# Altium PCB DB30.PcbDoc (part 6 of 8)
Units mil, origin at the board's own origin, x right, y up, seen from the top; angles counter-clockwise.
Board outline 3236.22 x 4456.69 mil, 8 copper layers (Top Layer, MidLayer1, MidLayer2, GND-Layer5, MidLayer3, VCC, MidLayer4, Bottom Layer), stack 61.8 mil thick; 219 components, 472 nets, 1811 pads, 1561 vias.
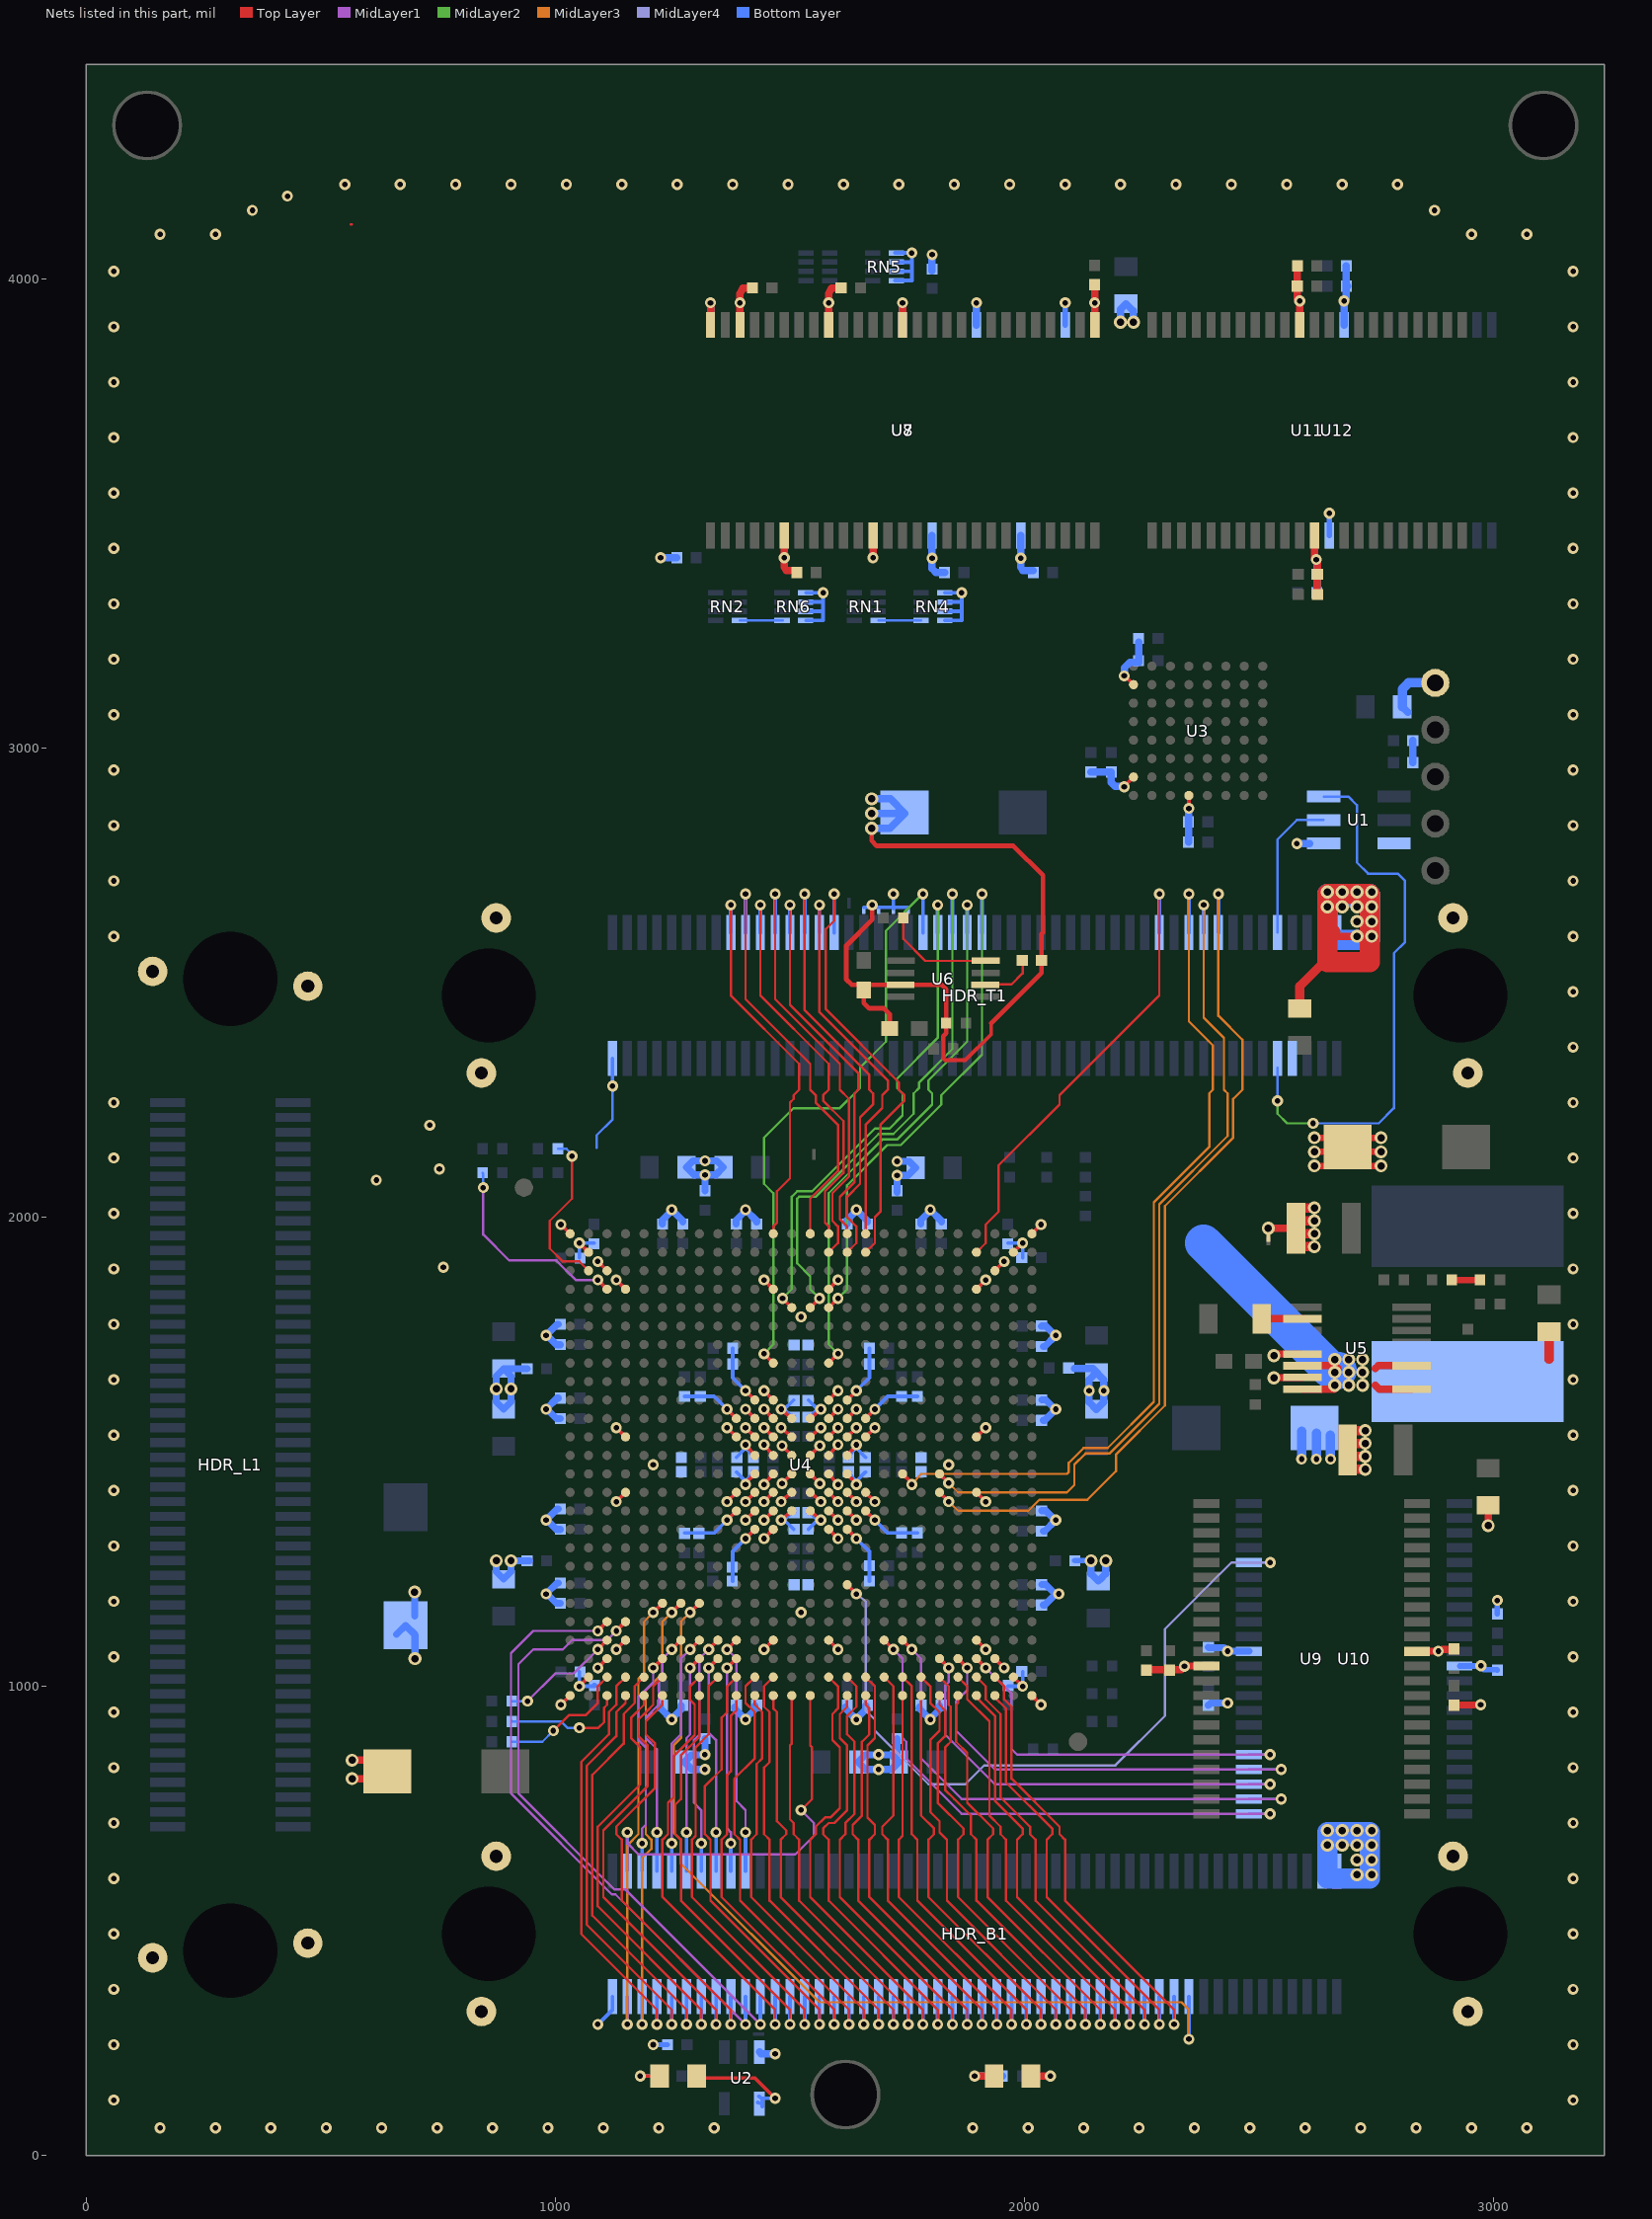
[diagram p12: the nets of this part, all layers, seen from the top]

## Via types
v1: diameter 23.62, hole 11.81, Top Layer to Bottom Layer, 944 vias
v2: diameter 23.62, hole 11.81, Top Layer to Bottom Layer, tented both sides, 477 vias
v3: diameter 27.56, hole 15.75, Top Layer to Bottom Layer, 139 vias
v4: diameter 23.62, hole 11.81, Top Layer to Bottom Layer, tented top, 1 vias

## Nets (pads, with @x,y where several pads share a name; then routed paths per layer and width w, separated by ;. In a path a pad name is that pad's centre, name@x,y a point inside that pad or via, vN(x,y) a via of type N, cw(c..) or ccw(c..) an arc to the next point about the centre after c; other vN are vias at no path point) (continued)
GND: C1.1 C2.2 C3.2 C4.2 C5.2 C6.2 C7.2 C8.2 C9.2 C10.2 C11.2 C12.2 C13.2 C14.2 C15.2 C16.2 C17.2 C18.2 C19.2 C20.2 C21.2 C22.2 C23.2 C24.2 C25.2 C26.2 C27.2 C28.2 C29.2 C30.2 C31.2 C32.2 C33.2 C34.2 C35.2 C36.2 C37.2 C38.2 C39.2 C40.2 C41.2 C42.2 C43.2 C44.2 C45.2 C46.2 C47.2 C48.2 C49.2 C50.2 C51.2 C52.2 C53.2 C54.2 C55.2 C56.2 C57.2 C58.2 C59.2 C60.2 C61.2 C62.2 C63.2 C64.2 C65.2 C66.2 C67.2 C68.2 C69.2 C70.2 C71.2 C72.2 C73.2 C74.2 C75.2 C76.2 C77.2 C78.2 C79.2 C80.2 C81.2 C82.2 C83.2 C84.2 C85.2 C86.2 C87.2 C88.2 C89.2 C90.2 C91.2 C92.2 C93.2 C94.2 C95.2 C96.2 C97.2 C98.2 C99.2 C100.2 C101.2 C102.2 C103.2 C104.2 C105.2 C106.2 C107.2 C108.1 C109.2 C110.2 C111.2 C112.2 C113.2 C114.2 C115.2 C116.2 C119.2 C120.2 C121.2 C122.2 C123.2 C125.2 C126.2 C127.2 C128.2 C129.2 C130.2 C131.2 C132.2 C133.2 C134.2 C135.2 C136.2 C137.2 C138.2 C139.2 C140.2 C141.2 C142.2 C143.2 C144.2 C145.2 C146.2 C147.2 C148.2 C149.2 C150.2 C151.2 HDR_B1.1 HDR_B1.98 HDR_B1.100 HDR_B1.MH1 HDR_B1.MH2 HDR_B1.MH3 HDR_B1.MH4 HDR_L1.MH1 HDR_L1.MH2 HDR_L1.MH3 HDR_L1.MH4 HDR_T1.1 HDR_T1.98 HDR_T1.100 HDR_T1.MH1 HDR_T1.MH2 HDR_T1.MH3 HDR_T1.MH4 LED2.2 NT4.2 NT5.2 NT6.2 NT7.2 NT8.2 R25.2 RN4.1 RN4.2 RN4.3 RN4.4 RN5.1 RN5.2 RN5.3 RN5.4 RN6.1 RN6.2 RN6.3 RN6.4 TP1.1 U1.1 U2.3 U3.E8 U3.H2 U3.H7 U4.A1 U4.A26 U4.AC4 U4.AC12 U4.AC15 U4.AC23 U4.AD3 U4.AD24 U4.AE2 U4.AE25 U4.AF1 U4.AF26 U4.B2 U4.B25 U4.C3 U4.C24 U4.D4 U4.D12 U4.D15 U4.D23 U4.K11 U4.K12 U4.K15 U4.K16 U4.L10 U4.L11 U4.L12 U4.L13 U4.L14 U4.L15 U4.L16 U4.L17 U4.M4 U4.M10 U4.M11 U4.M12 U4.M13 U4.M14 U4.M15 U4.M16 U4.M17 U4.M23 U4.N11 U4.N12 U4.N13 U4.N14 U4.N15 U4.N16 U4.P11 U4.P12 U4.P13 U4.P14 U4.P15 U4.P16 U4.R4 U4.R10 U4.R11 U4.R12 U4.R13 U4.R14 U4.R15 U4.R16 U4.R17 U4.R23 U4.T10 U4.T11 U4.T12 U4.T13 U4.T14 U4.T15 U4.T16 U4.T17 U4.U11 U4.U12 U4.U15 U4.U16 U5.13 U5.15 U6.3 U7.6 U7.12 U7.28 U7.41 U7.46 U7.52 U7.54 U8.6 U8.12 U8.28 U8.41 U8.46 U8.52 U8.54 U9.12 U9.34 U10.12 U10.34 U11.12 U11.34 U12.12 U12.34 | length 15039.3
  Top Layer w5: 564,4116 566,4116
  Top Layer w7.87: v1(1011.81,960.63) U4.AF1@1031.5,980.31 ; v1(1011.81,1984.25) U4.A1@1031.5,1964.57 ; v1(1051.18,1000) U4.AE2@1070.87,1019.68 ; v1(1051.18,1944.88) U4.B2@1070.87,1925.2 ; v1(1090.55,1039.37) U4.AD3@1110.24,1059.05 ; v1(1090.55,1905.51) U4.C3@1110.24,1885.83 ; v1(1129.92,1078.74) U4.AC4@1149.61,1098.43 ; v1(1129.92,1393.7) U4.R4@1149.61,1413.39 ; v1(1129.92,1551.18) U4.M4@1149.61,1531.5 ; v1(1129.92,1866.14) U4.D4@1149.61,1846.46 ; v1(1366.14,1354.33) U4.T10@1385.83,1374.02 ; v1(1366.14,1393.7) U4.R10@1385.83,1413.39 ; v1(1366.14,1551.18) U4.M10@1385.83,1531.5 ; v1(1366.14,1590.55) U4.L10@1385.83,1570.87 ; v1(1405.51,1314.96) U4.U11@1425.2,1334.65 ; v1(1405.51,1354.33) U4.T11@1425.2,1374.02 ; v1(1405.51,1393.7) U4.R11@1425.2,1413.39 ; v1@1405.51,1433.07 U4.P11@1425.2,1452.76 ; v1(1405.51,1514.76) U4.N11@1425.2,1492.13 ; v1(1405.51,1551.18) U4.M11@1425.2,1531.5 ; v1(1405.51,1590.55) U4.L11@1425.2,1570.87 ; v1(1405.51,1629.92) U4.K11@1425.2,1610.24 ; v1(1444.88,1078.74) U4.AC12@1464.57,1098.43 ; v1(1444.88,1314.96) U4.U12@1464.57,1334.65 ; v1(1444.88,1354.33) U4.T12@1464.57,1374.02 ; v1(1444.88,1393.7) U4.R12@1464.57,1413.39 ; v1(1444.88,1430.12) U4.P12@1464.57,1452.76 ; v1(1444.88,1514.76) U4.N12@1464.57,1492.13 ; v1(1444.88,1551.18) U4.M12@1464.57,1531.5 ; v1(1444.88,1590.55) U4.L12@1464.57,1570.87 ; v1(1444.88,1629.92) U4.K12@1464.57,1610.24 ; v1(1444.88,1866.14) U4.D12@1464.57,1846.46 ; v1(1481.3,1354.33) U4.T13@1503.94,1374.02 ; v1(1481.3,1393.7) U4.R13@1503.94,1413.39 ; v1(1481.3,1551.18) U4.M13@1503.94,1531.5 ; v1(1481.3,1590.55) U4.L13@1503.94,1570.87 ; v1(1483.27,1432.09) U4.P13@1503.94,1452.76 ; v1(1483.27,1512.8) U4.N13@1503.94,1492.13 ; U4.T14@1543.31,1374.02 v1(1565.94,1354.33) ; U4.R14@1543.31,1413.39 v1(1565.94,1393.7) ; U4.P14@1543.31,1452.76 v1(1563.98,1432.09) ; U4.N14@1543.31,1492.13 v1(1563.98,1512.8) ; U4.M14@1543.31,1531.5 v1(1565.94,1551.18) ; U4.L14@1543.31,1570.87 v1(1565.94,1590.55) ; U4.AC15@1582.68,1098.43 v1(1602.36,1078.74) ; U4.U15@1582.68,1334.65 v1(1602.36,1314.96) ; U4.T15@1582.68,1374.02 v1(1602.36,1354.33) ; U4.R15@1582.68,1413.39 v1(1602.36,1393.7) ; U4.P15@1582.68,1452.76 v1(1602.36,1430.12) ; U4.N15@1582.68,1492.13 v1(1602.36,1514.76) ; U4.M15@1582.68,1531.5 v1(1602.36,1551.18) ; U4.L15@1582.68,1570.87 v1(1602.36,1590.55) ; U4.K15@1582.68,1610.24 v1(1602.36,1629.92) ; U4.D15@1582.68,1846.46 v1(1602.36,1866.14) ; U4.U16@1622.05,1334.65 v1(1641.73,1314.96) ; U4.T16@1622.05,1374.02 v1(1641.73,1354.33) ; U4.R16@1622.05,1413.39 v1(1641.73,1393.7) ; U4.P16@1622.05,1452.76 v1(1641.73,1430.12) ; U4.N16@1622.05,1492.13 v1(1641.73,1514.76) ; U4.M16@1622.05,1531.5 v1(1641.73,1551.18) ; U4.L16@1622.05,1570.87 v1(1641.73,1590.55) ; U4.K16@1622.05,1610.24 v1(1641.73,1629.92) ; U4.T17@1661.42,1374.02 v1(1681.1,1354.33) ; U4.R17@1661.42,1413.39 v1(1681.1,1393.7) ; U4.M17@1661.42,1531.5 v1(1681.1,1551.18) ; U4.L17@1661.42,1570.87 v1(1681.1,1590.55) ; U4.AC23@1897.64,1098.43 v1(1917.32,1078.74) ; U4.R23@1897.64,1413.39 v1(1917.32,1393.7) ; U4.M23@1897.64,1531.5 v1(1917.32,1551.18) ; U4.D23@1897.64,1846.46 v1(1917.32,1866.14) ; U4.AD24@1937.01,1059.05 v1(1956.69,1039.37) ; U4.C24@1937.01,1885.83 v1(1956.69,1905.51) ; U4.AE25@1976.38,1019.68 v1(1996.06,1000) ; U4.B25@1976.38,1925.2 v1(1996.06,1944.88) ; U4.AF26@2015.75,980.31 v1(2035.43,960.63) ; U4.A26@2015.75,1964.57 v1(2035.43,1984.25) ; v1@2212.6,2918.31 U3.H7@2232.28,2937.99 ; v1@2212.6,3154.53 U3.H2@2232.28,3134.84 ; v1(2350.4,2871.07) U3.E8@2350.39,2898.62
  Top Layer w8: 1826.77,2377.95 1827.63,2377.09 1827.63,2337.72 1830.71,2334.65 1874.02,2334.65 1929.13,2389.76 1929.13,2413.38
  Top Layer w10: C126.2@1657.48,2484.25 1657.48,2456.7 1669.29,2444.88 1700.79,2444.88 1712.59,2433.07 C125.2@1712.59,2409.44 ; C126.2@1664.36,2495.07 1823.82,2495.07 1833.15,2485.75 1833.15,2392.2 1826.77,2385.83 1826.77,2377.95 ; v3(1674.21,2828.74) 1674.21,2802.16 1685.04,2791.33 1976.37,2791.33 2039.37,2728.34 2039.37,2606.29 2036.41,2603.34 2036.41,2520.67 1929.13,2413.38 ; v2(1675.2,2665.35) 1675.2,2633.86 1620.08,2578.74 1620.08,2506.89 1631.89,2495.07 1678.15,2495.07
  Top Layer w13.78: v3(2618.11,2109.29) C119.2@2669.08,2109.29 ; v3(2618.11,2139.29) C119.2@2669.08,2139.29 ; v3(2618.11,2169.29) C119.2@2669.08,2169.29 ; C119.2@2709.01,2109.29 v3(2759.99,2109.29) ; C119.2@2709.01,2139.29 v3(2759.99,2139.29) ; C119.2@2709.01,2169.29 v3(2759.99,2169.29)
  Top Layer w15: C139.2@2259.84,1034.45 2260.82,1035.43 2334.65,1035.43 2341,1041.79 v1(2341,1043) 2341.3,1043.3 U9.34@2387.89,1043.3 ; v3(2531.5,1657.48) 2532.26,1658.25 U5.15@2591.08,1658.25 ; v3(2531.5,1704.72) 2535.43,1708.66 U5.13@2590.55,1708.66 ; U9.12@2836.71,1074.8 2881.8,1074.8 v1(2882,1075) 2886.02,1075 2889.76,1078.74 2914.47,1078.74 C136.2@2915.44,1079.71 ; C138.2@2915.3,957.92 2917.32,957.76 2914.45,960.63 v1(2972.44,960.63)
  Top Layer w15.75: v3(566.93,803.15) 626.34,803.15 C23.2@641.81,818.62 617.91,842.52 v3(566.93,842.52) ; U7.54@1330.71,3901.57 v2(1330.71,3948.82) ; U7.52@1393.7,3901.57 v2(1393.7,3948.82) ; v2@1393.7,3944.88 1393.7,3964.57 ; 1393.7,3968.51 1399.61,3980.32 C132.2@1420.27,3980.31 ; C132.2@1416.34,3980.32 C132.2@1418.31,3978.34 ; U7.6@1488.19,3452.76 1488.19,3409.45 v2(1488.19,3405.51) 1488.19,3385.83 1492.13,3377.95 C129.2@1514.77,3377.95 ; U7.46@1582.68,3901.57 v2(1582.68,3948.82) ; v2@1582.68,3944.88 1582.68,3964.57 1582.68,3968.51 1588.58,3980.32 C133.2@1609.25,3980.31 ; v2(1677.17,3405.51) U7.12@1677.17,3452.76 ; U7.41@1740.16,3901.57 v2(1740.16,3948.82) ; LED2.2@2011.81,169.29 v1(2055.12,169.29) ; U7.28@2149.61,3901.57 C128.2@2149.6,3987.2 ; v3(2519.68,1976.38) C123.2@2582.67,1976.38 ; C145.2@2580.43,4028.54 C145.2@2580.57,4028.67 ; C145.2@2581.69,4027.55 2581.69,3957.68 v2(2586.61,3952.76) U11.34@2586.61,3901.57 ; U11.12@2618.11,3452.76 2618.11,3405.51 2624.72,3398.9 C148.2@2624.72,3370.07 C148.2@2625.71,3371.06 ; C144.2@2623.74,3329.72 2623.74,3370.07 C148.2@2623.77,3370.23 ; 2645.67,2598.43 v3(2708.66,2598.43) ; v3(2988.19,1342.52) C120.2@2988.18,1385.82
  Top Layer w19.68: C24.2@2586.61,2444.88 2586.61,2492.12 2649.61,2555.12 ; 3118.09,1696.83 C122.2@3118.1,1755.9
  Top Layer w20: C123.2@2578.73,1937 v3(2618.1,1937) ; C123.2@2578.73,1964.56 v3(2618.1,1964.56) ; C123.2@2578.73,1992.12 v3(2618.1,1992.12) ; C123.2@2578.73,2019.68 v3(2618.1,2019.68) ; C121.2@2687.01,1462.59 v3(2726.38,1462.59) ; C121.2@2687.01,1490.15 v3(2726.38,1490.15) ; C121.2@2687.01,1517.71 v3(2726.38,1517.71) ; C121.2@2687.01,1545.27 v3(2726.38,1545.27)
  Top Layer w39.37: 2645.67,2606.3 2653.54,2606.3
  Top Layer w43.31: 2645.67,2543.31 2736.22,2543.31 2736.22,2688.98 2645.67,2688.98 2645.67,2543.31
  Bottom Layer w5: 1087.87,2147.57 1087.87,2174.07 1122.05,2208.25 v2(1122.05,2279.53)
  Bottom Layer w7.87: C35.2@1051.18,1031.5 v1(1051.18,1000) C38.2@1082.68,1000 ; C41.2@1051.18,1913.39 v1(1051.18,1944.88) C33.2@1082.68,1944.88 ; v1@1082.68,1039.37 v1(1090.55,1039.37) v1@1090.55,1031.5 ; v1@1082.68,1905.51 v1(1090.55,1905.51) v1@1090.55,1913.38 ; v2(1090.55,279.53) 1122.05,311.02 HDR_B1.1@1122.05,338.58 ; v2(1122.05,2279.53) HDR_T1.1@1122.05,2338.58 ; v1(1248.03,2015.75) v1@1251.97,2015.75 ; C19.2@1275.59,1326.77 1311.02,1326.77 1338.58,1326.77 v1(1366.14,1354.33) ; C13.2@1275.59,1618.11 1276.38,1618.11 1306.51,1618.11 1338.58,1618.11 v1(1366.14,1590.55) ; C20.2@1377.95,1224.41 1377.95,1228.34 1377.95,1253.94 1377.95,1287.4 v1(1405.51,1314.96) ; C18.2@1377.95,1720.47 C14.2@1377.95,1687.01 1377.95,1657.48 v1(1405.51,1629.92) ; C66.2@1385.83,1456.69 1405.51,1437.01 C95.2@1425.2,1456.69 ; C93.2@1385.83,1488.19 v1@1405.51,1507.87 ; v1(1405.51,1514.76) v1@1405.51,1507.88 ; C94.2@1425.2,1488.19 v1@1405.51,1507.88 ; v1(1481.3,1354.33) v1@1488.19,1354.33 ; C88.2@1507.87,1334.65 v1@1488.19,1354.33 ; C82.2@1507.87,1374.02 v1@1488.19,1354.33 ; C73.2@1507.87,1570.87 1488.19,1590.55 C67.2@1507.87,1610.24 ; RN6.4@1534.64,3271.65 1570.87,3271.65 v1(1570.87,3330.71) RN6.1@1534.64,3330.71 ; RN6.3@1534.64,3291.34 1570.87,3291.34 ; RN6.2@1534.64,3311.02 1570.87,3311.02 ; C92.2@1539.37,1334.65 v1@1559.06,1354.33 ; C98.2@1539.37,1374.02 v1@1559.06,1354.33 ; C74.2@1539.37,1570.87 v1@1559.06,1590.55 ; C75.2@1539.37,1610.24 v1@1559.05,1590.55 ; v1(1565.94,1354.33) v1@1559.06,1354.33 ; v1(1565.94,1590.55) v1@1559.06,1590.55 ; C90.2@1622.05,1456.69 v1@1641.73,1437.01 ; C78.2@1622.05,1488.19 v1@1641.73,1507.87 ; v1(1641.73,1314.96) 1669.29,1287.4 C7.2@1669.29,1256.89 C15.2@1669.29,1224.41 ; v1(1641.73,1430.12) v1@1641.73,1437.01 ; v1(1641.73,1514.76) v1@1641.73,1507.87 ; v1(1641.73,1629.92) 1669.29,1657.48 1669.29,1688.98 C21.2@1669.29,1720.47 ; NT7.2@1657.48,2660.43 NT4.2@1751.97,2660.43 ; C77.2@1661.42,1456.69 v1@1641.73,1437.01 ; C72.2@1661.42,1488.19 v1@1641.73,1507.87 ; v1(1681.1,1354.33) 1708.66,1326.77 1744.09,1326.77 1771.06,1326.77 C8.2@1771.65,1326.77 ; v1(1681.1,1590.55) 1708.66,1618.11 C17.2@1738.19,1618.11 C10.2@1771.65,1618.11 ; NT5.2@1720.47,2657.48 v2(1720.47,2688.98) ; RN5.4@1723.62,3996.06 1759.84,3996.06 v1(1759.84,4055.12) RN5.1@1723.62,4055.12 ; RN5.3@1723.62,4015.75 1759.84,4015.75 ; RN5.2@1723.62,4035.43 1759.84,4035.43 ; C51.2@1771.65,952.76 C51.2@1772.14,952.26 ; RN4.4@1829.92,3271.65 1866.14,3271.65 v1(1866.14,3330.71) RN4.1@1829.92,3330.71 ; RN4.3@1829.92,3291.34 1866.14,3291.34 ; RN4.2@1829.92,3311.02 1866.14,3311.02 ; C31.2@1964.57,1000 v1(1996.06,1000) C36.2@1996.06,1031.5 ; C34.2@1964.57,1944.88 v1(1996.06,1944.88) C37.2@1996.06,1913.39
  Bottom Layer w9.84: v1(1208.66,236.22) C108.1@1239.17,236.22
  Bottom Layer w11.81: C38.2@1083.25,1001.71 C38.2@1083.47,1001.49 ; U8.52@2086.61,3901.57 v2(2086.61,3948.82) ; C39.2@2107.28,1267.71 v3(2141.73,1267.72) ; U8.54@2149.61,3901.57 v2(2149.61,3948.82) ; U12.12@2649.61,3452.76 v2(2649.61,3500) ; U10.34@2927.25,1043.3 v1@2972.3,1043.3 ; v1(2973,1044) v1@2972.3,1043.3 ; C143.2@3007.87,1034.45 3006.88,1035.43 2979.33,1035.43 2972.3,1042.47 v1@2972.3,1043.3 ; C141.2@3007.87,1154.53 v1(3007.87,1183.07)
  Bottom Layer w15: C106.2@661.42,1110.59 C106.2@680.83,1130 700.79,1110.04 v3(700.79,1059.06) ; C106.2@700.23,1149.41 v3(700.23,1200.94) ; v3(874.02,1267.72) 874.02,1244.09 C45.2@889.76,1228.34 905.51,1244.09 v3(905.51,1267.72) C28.2@944.88,1267.72 ; C32.2@939.96,1677.16 C43.2@889.76,1677.16 ; v1(980.31,1196.85) 1003.94,1220.48 C56.2@1006.89,1220.48 ; v1(980.31,1354.33) 1003.94,1377.96 C101.2@1006.89,1377.96 ; v1(980.31,1590.55) 1003.94,1614.18 C102.2@1006.89,1614.18 ; v1(980.31,1748.03) 1003.94,1771.66 C104.2@1006.89,1771.66 ; v1@984.31,1194.81 1002.24,1176.88 C84.2@1010.54,1176.88 ; v1@984.31,1352.29 1002.24,1334.36 C53.2@1010.54,1334.36 ; v1@984.31,1588.51 1002.24,1570.58 C58.2@1010.54,1570.58 ; v1@984.31,1745.99 1002.24,1728.07 C61.2@1010.54,1728.07 ; C62.2@1224.4,955.71 1224.4,952.76 v1(1248.03,929.13) ; C59.2@1228.06,1985.52 1228.06,1993.82 v1@1245.99,2011.75 ; v1(1248.03,2015.75) 1271.66,1992.12 C70.2@1271.66,1989.17 ; v1@1250.07,933.13 1268,951.06 C85.2@1268,959.36 ; v2(1318.9,822.83) 1291.33,822.83 C49.2@1275.59,838.58 1291.34,854.33 v2(1318.9,854.33) C40.2@1318.89,888.78 ; C29.2@1318.89,2056.1 1318.89,2089.89 v1(1319.02,2090) ; C83.2@1381.88,955.71 1381.88,952.76 v1(1405.51,929.13) ; C100.2@1385.54,1985.52 1385.54,1993.82 v1@1403.47,2011.75 ; v1(1405.51,2015.75) 1429.14,1992.12 C65.2@1429.14,1989.17 ; v1@1407.55,933.13 1425.48,951.06 C57.2@1425.48,959.36 ; C52.2@1618.11,955.71 1618.11,952.76 v1(1641.73,929.13) ; C99.2@1621.77,1985.52 1621.77,1993.82 v1@1639.69,2011.75 ; v1(1641.73,2015.75) 1665.36,1992.12 C64.2@1665.36,1989.17 ; v1@1643.77,933.13 1661.7,951.06 C91.2@1661.7,959.36 ; C48.2@1728.34,850.4 C30.2@1728.34,888.78 ; C26.2@1728.34,2052.41 v1@1728.34,2092.69 ; v1@1728.34,2085.06 v1(1728.58,2089.02) 1751.54,2089 C44.2@1767.84,2105.29 1754.13,2119 v1(1728.58,2119.02) ; C51.2@1775.59,955.71 1775.59,952.76 v1(1799.21,929.13) ; C68.2@1779.25,1985.52 1779.25,1993.82 v1@1797.18,2011.75 ; v1(1799.21,2015.75) 1822.84,1992.12 C60.2@1822.84,1989.17 ; v1@1801.25,933.13 1819.18,951.06 C69.2@1819.18,959.36 ; C89.2@2036.41,1767.71 2036.7,1768 2045,1768 2062.93,1750.07 2066.93,1750.07 v1(2066.93,1748.03) 2043.3,1724.41 C54.2@2040.35,1724.41 ; C103.2@2036.7,1216.82 2045,1216.82 v1@2062.93,1198.89 ; C55.2@2036.7,1374.3 2045,1374.3 v1@2062.93,1356.37 ; C71.2@2036.7,1610.52 2045,1610.52 v1@2062.93,1592.59 ; C50.2@2040.35,1173.22 2043.3,1173.22 v1@2066.93,1196.85 ; C63.2@2040.35,1566.93 2043.3,1566.93 v1(2066.93,1590.55) ; C105.2@2040.64,1331 2040.35,1330.71 2043.3,1330.7 v1(2066.93,1354.33) ; v1@2069.99,1194.01 v1(2072.99,1197.01) ; C140.2@2391.82,959.64 2396.75,964.57 v1(2433.07,964.57) ; C142.2@2391.82,1083.65 2392.8,1082.68 2425.2,1082.68 2432.87,1075 v1(2433,1075) 2433.21,1074.79 U10.12@2478.44,1074.79 ; C43.2@889.76,1677.16 874.02,1661.42 874.02,1606.29 C4.2@889.76,1590.55 905.51,1606.3 905.51,1661.41 C43.2@889.76,1677.16 ; C42.2@1279.53,2106.29 1295.93,2089.89 1341.86,2089.89 C25.2@1358.26,2106.29 1344.56,2120 1293.23,2120 C42.2@1279.53,2106.29 ; C5.2@1645.67,838.58 1661.41,822.83 1716.53,822.83 C48.2@1732.28,838.58 1716.53,854.33 1661.42,854.33 C5.2@1645.67,838.58
  Bottom Layer w15.75: v2(1224.41,3405.51) C130.2@1258.85,3405.51 ; U8.28@1330.71,3901.57 v2@1330.71,3944.88 ; U2.3@1435.04,220.47 1438.97,216.54 v1(1468.5,216.54) ; v3(1674.21,2828.74) 1713.39,2828.74 1745.15,2860.51 1713.93,2891.73 v3(1674.21,2891.73) ; v3(1674.21,2860.24) C107.2@1744.88,2860.24 ; U8.41@1740.16,3901.57 v2(1740.16,3948.82) ; U8.12@1803.15,3452.76 1803.15,3405.51 v2(1803.15,3404.53) 1803.15,3381.89 1811.04,3374.01 C135.2@1829.72,3374.01 ; C131.2@1803.15,4016.72 1803.15,4047.24 v2(1803.15,4051.18) ; U8.46@1897.64,3901.57 v2(1897.64,3948.82) v2@1897.64,3944.88 ; U8.6@1992.13,3452.76 1992.13,3385.83 1996.06,3377.95 C134.2@2018.71,3377.95 ; 2107.28,1677.16 2145.66,1677.16 2169.29,1653.54 2169.29,1606.3 C6.2@2153.54,1590.55 2137.8,1606.29 2137.8,1653.54 C46.2@2153.54,1669.29 ; v3(2141.73,1267.72) 2141.73,1240.15 C47.2@2157.48,1224.41 2161.42,1228.35 2173.23,1240.16 v3(2173.23,1267.72) ; C114.2@2141.73,2948.82 C111.2@2185.04,2948.82 2185.04,2926.19 2192.92,2918.31 v1@2212.6,2918.31 ; v3(2204.72,3907.48) 2204.72,3935.04 C116.2@2216.53,3946.84 2232.28,3931.1 v3(2232.28,3907.48) ; v1(2212.6,3153.54) 2212.6,3170.28 2224.41,3182.09 2243.11,3182.09 C110.2@2243.11,3225.39 ; C109.2@2349.4,2799.21 2350.4,2800.2 v1(2350.4,2871.07) ; v2(2580.71,2796.26) 2608.06,2796.26 U1.1@2608.25,2796.45 ; v2(2622.05,3401.57) 2623.03,3400.6 C146.2@2623.03,3330.7 ; v2@2681.1,3956.7 v2(2681.1,3952.76) 2686.02,3957.67 C151.2@2686.02,3984.25 ; U12.34@2681.38,3901.57 v2@2681.38,3944.88 ; C147.2@2686.02,4027.55 2686.02,3987.2 C151.2@2688.98,3984.25 ; C115.2@2805.12,3087.59 C115.2@2816.93,3075.79 ; C2.2@2827.75,2968.5 C1.1@2827.75,3015.74
  Bottom Layer w20: v1(2590.55,1484.25) C3.2@2590.55,1543.31 ; v1(2622.05,1484.25) C3.2@2622.05,1539.37 ; v1(2652.34,1484.25) C3.2@2652.34,1535.44 ; C115.2@2805.12,3087.59 2805.12,3125.12 2818.67,3138.67 TP1.1@2875.71,3138.67
  Bottom Layer w43.31: v3@2649.61,681.1 v3@2736.22,681.1 ; v3@2649.61,2681.1 v3@2736.22,2681.1 ; v3@2736.22,681.1 2736.22,688.98 2645.67,688.98 2645.67,590.55 2736.22,590.55 2736.22,598.42 2736.22,629.92 2736.22,661.42 v3@2736.22,681.1 ; v3@2736.22,2681.1 2736.22,2688.98 2645.67,2688.98 2645.67,2590.55 2736.22,2590.55 2736.22,2598.43 2736.22,2629.92 2736.22,2661.42 v3@2736.22,2681.1
  other v1: 157.48,59.06 275.59,59.06 393.7,59.06 511.81,59.06 629.92,59.06 748.03,59.06 866.14,59.06 984.25,59.06 1102.36,59.06 1220.47,59.06 1338.58,59.06 1889.76,59.06 2007.87,59.06 2125.98,59.06 2244.09,59.06 2362.2,59.06 2480.31,59.06 2598.43,59.06 2716.54,59.06 2834.65,59.06 2952.76,59.06 3070.87,59.06 59.06,118.11 3169.29,118.11 59.06,236.22 3169.29,236.22 59.06,354.33 3169.29,354.33 59.06,472.44 3169.29,472.44 59.06,590.55 3169.29,590.55 59.06,708.66 3169.29,708.66 1688.98,822.83 59.06,826.77 3169.29,826.77 1688.98,854.33 59.06,944.88 3169.29,944.88 59.06,1062.99 3169.29,1062.99 1523.62,1157.48 59.06,1181.1 3169.29,1181.1 59.06,1299.21 3169.29,1299.21 59.06,1417.32 3169.29,1417.32 1405.51,1430.12 1208.66,1472.44 1838.58,1472.44 59.06,1535.43 3169.29,1535.43 2137.8,1629.92 2169.29,1629.92 59.06,1653.54 3169.29,1653.54 59.06,1771.65 3169.29,1771.65 1523.62,1787.4 59.06,1889.76 3169.29,1889.76 761.3,1893.2 59.06,2007.87 3169.29,2007.87 618.5,2078.9 753,2102.5 1319.02,2120 59.06,2125.98 3169.29,2125.98 732.5,2196 59.06,2244.09 3169.29,2244.09 3169.29,2362.2 3169.29,2480.32 59.06,2598.43 3169.29,2598.43 59.06,2716.54 3169.29,2716.54 59.06,2834.65 3169.29,2834.65 2212.6,2917.32 59.06,2952.76 3169.29,2952.76 59.06,3070.87 3169.29,3070.87 59.06,3188.98 3169.29,3188.98 59.06,3307.09 3169.29,3307.09 59.06,3425.2 3169.29,3425.2 59.06,3543.31 3169.29,3543.31 59.06,3661.42 3169.29,3661.42 59.06,3779.53 3169.29,3779.53 59.06,3897.64 3169.29,3897.64 59.06,4015.75 3169.29,4015.75 157.48,4094.49 275.59,4094.49 2952.76,4094.49 3070.87,4094.49 354.33,4145.67 2874.02,4145.67 429,4176 551.18,4200.79 669.29,4200.79 787.4,4200.79 905.51,4200.79 1023.62,4200.79 1141.73,4200.79 1259.84,4200.79 1377.95,4200.79 1496.06,4200.79 1614.17,4200.79 1732.28,4200.79 1850.39,4200.79 1968.5,4200.79 2086.61,4200.79 2204.72,4200.79 2322.83,4200.79 2440.94,4200.79 2559.06,4200.79 2677.17,4200.79 2795.28,4200.79
  other v2: 1992.13,3404.53
  other v3: 2708.66,598.42 2740.16,598.42 2708.66,629.92 2740.16,629.92 2645.67,661.42 2677.17,661.42 2708.66,661.42 2740.16,661.42 2645.67,692.91 2677.17,692.91 2708.66,692.91 2740.16,692.91 874.02,1633.86 905.51,1633.86 2740.16,2598.43 2708.66,2629.92 2740.16,2629.92 2645.67,2661.42 2677.17,2661.42 2708.66,2661.42 2740.16,2661.42 2645.67,2692.91 2677.17,2692.91 2708.66,2692.91 2740.16,2692.91
HSWAP_EN: R4.2 U4.C2 | length 357.5
  Top Layer w5: v1(1035.43,2129.92) 1035.43,2039.43 988.19,1992.19 988.19,1933.07 1015.75,1905.51 1051.18,1905.51 U4.C2@1070.87,1885.83
  Bottom Layer w5: R4.2@1005.43,2145.66 1023.62,2145.67 1035.43,2133.86 v1(1035.43,2129.92)
IO0: HDR_B1.7 U4.AE4 | length 905.2
  Top Layer w5: U4.AE4@1149.61,1019.68 1129.92,1000 1129.92,960.63 1114.17,944.88 1114.17,917.32 1114.17,905.51 1114.17,897.64 1055.12,838.58 1055.12,472.44 1216.54,311.02 v2(1216.54,279.53)
  Bottom Layer w7.87: v2(1216.54,279.53) HDR_B1.7@1216.54,338.58
IO1: HDR_B1.9 U4.AF4 | length 869.1
  Top Layer w5: U4.AF4@1149.61,980.31 1149.61,964.57 1129.92,944.88 1129.92,917.32 1129.92,905.51 1129.92,893.7 1066.93,830.71 1066.93,492.13 1248.03,311.02 v2(1248.03,279.53)
  Bottom Layer w7.87: v2(1248.03,279.53) HDR_B1.9@1248.03,338.58
IO2: HDR_B1.11 U4.AE5 | length 928
  Top Layer w5: U4.AE5@1188.98,1019.68 1169.29,1000 1169.29,964.57 1145.67,940.94 1145.67,917.32 1145.67,905.51 1145.67,877.95 1078.74,811.02 1078.74,511.81 1279.53,311.02 v2(1279.53,279.53)
  Bottom Layer w7.87: v2(1279.53,279.53) HDR_B1.11@1279.53,338.58
IO3: HDR_B1.13 U4.AF5 | length 908.2
  Top Layer w5: U4.AF5@1188.98,980.31 1188.98,960.63 1161.42,933.07 1161.42,917.32 1161.42,905.51 1161.42,889.76 1181.1,870.08 1181.1,791.34 1090.55,700.79 1090.55,531.5 1311.02,311.02 v2(1311.02,279.53)
  Bottom Layer w7.87: v2(1311.02,279.53) HDR_B1.13@1311.03,338.58
IO4: HDR_B1.15 U4.AE6 | length 967.2
  Top Layer w5: U4.AE6@1228.35,1019.68 1208.66,1000 1208.66,996.06 1208.66,964.57 1208.66,960.63 1196.85,948.82 1177.17,929.13 1177.17,917.32 1177.17,905.51 1177.17,893.7 1196.85,874.02 1196.85,787.4 1102.36,692.91 1102.36,551.18 1342.52,311.02 v2(1342.52,279.53)
  Bottom Layer w7.87: v2(1342.52,279.53) HDR_B1.15@1342.52,338.58
IO5: HDR_B1.17 U4.AF6 | length 918
  Top Layer w5: U4.AF6@1228.35,980.31 1228.35,960.63 1192.91,925.2 1192.91,917.32 1192.91,905.51 1192.91,897.64 1212.6,877.95 1212.6,783.46 1129.92,700.79 1129.92,685.04 1141.73,673.23 1141.73,543.31 1374.02,311.02 v2(1374.02,279.53)
  Bottom Layer w7.87: v2(1374.02,279.53) HDR_B1.17@1374.02,338.58
IO6: HDR_B1.19 U4.AB3 | length 1294.6
  Top Layer w7.87: v1(1090.55,1118.11) U4.AB3@1110.24,1137.8
  MidLayer1 w5: v1(1090.55,1118.11) 968.5,1118.11 952.76,1118.11 905.51,1070.87 905.51,771.65 1120.32,556.84 1128.2,556.84 v2(1405.51,279.53)
  Bottom Layer w7.87: v2(1405.51,279.53) HDR_B1.19@1405.51,338.58
IO7: HDR_B1.21 U4.AB4 | length 1320.1
  Top Layer w7.87: v1(1129.92,1118.11) U4.AB4@1149.61,1137.8
  MidLayer1 w5: v1(1129.92,1118.11) 1110.24,1098.43 1035.43,1098.43 1015.75,1078.74 968.5,1078.74 952.76,1078.74 921.26,1047.24 921.26,771.65 1125.98,566.93 1149.61,566.93 v2(1437.01,279.53)
  Bottom Layer w7.87: v2(1437.01,279.53) HDR_B1.21@1437.01,338.58
IO8: HDR_B1.23 U4.AE8 | length 939.3
  Top Layer w5: U4.AE8@1307.09,1019.68 1287.4,1000 1287.4,971.17 1297.09,961.49 1297.09,896.24 1251.97,851.12 1251.97,763.78 1240.16,751.97 1240.16,685.04 1228.35,673.23 1228.35,551.18 1468.5,311.02 v2(1468.5,279.53)
  Bottom Layer w7.87: v2(1468.5,279.53) HDR_B1.23@1468.51,338.58
IO9: HDR_B1.25 U4.AF8 | length 882.2
  Top Layer w5: U4.AF8@1307.09,980.31 1307.09,917.32 1307.09,905.51 1307.09,892.09 1267.72,852.72 1267.72,759.84 1255.91,748.03 1255.91,685.04 1267.72,673.23 1267.72,543.31 1500,311.02 v2(1500,279.53)
  Bottom Layer w7.87: v2(1500,279.53) HDR_B1.25@1500,338.58
IO10: HDR_B1.27 U4.AE9 | length 921.5
  Top Layer w5: U4.AE9@1346.46,1019.68 1326.77,1000 1326.77,917.32 1326.77,905.51 1326.77,897.64 1299.21,870.08 1299.21,681.1 1291.34,673.23 1291.34,551.18 1531.5,311.02 v2(1531.5,279.53)
  Bottom Layer w7.87: v2(1531.5,279.53) HDR_B1.27@1531.5,338.58
IO11: HDR_B1.29 U4.AE10 | length 928
  Top Layer w5: U4.AE10@1385.83,1019.68 1366.14,1000 1366.14,944.88 1354.33,933.07 1354.33,917.32 1354.33,905.51 1354.33,822.83 1318.9,787.4 1318.9,685.04 1330.71,673.23 1330.71,543.31 1562.99,311.02 v2(1562.99,279.53)
  Bottom Layer w7.87: v2(1562.99,279.53) HDR_B1.29@1562.99,338.58
IO12: HDR_B1.31 U4.AF10 | length 872.4
  Top Layer w5: U4.AF10@1385.83,980.31 1385.83,948.82 1374.02,937.01 1374.02,917.32 1374.02,905.51 1374.02,818.9 1366.14,811.02 1366.14,803.15 1366.14,685.04 1354.33,673.23 1354.33,551.18 1594.49,311.02 v2(1594.49,279.53)
  Bottom Layer w7.87: v2(1594.49,279.53) HDR_B1.31@1594.49,338.58
IO13: HDR_B1.33 U4.AE11 | length 934.6
  Top Layer w5: U4.AE11@1425.2,1019.68 1405.51,1000 1405.51,964.57 1425.2,944.88 1425.2,917.32 1425.2,905.51 1425.2,846.46 1381.89,803.15 1381.89,685.04 1393.7,673.23 1393.7,543.31 1625.99,311.02 v2(1625.99,279.53)
  Bottom Layer w7.87: v2(1625.99,279.53) HDR_B1.33@1625.99,338.58
IO14: HDR_B1.35 U4.AF11 | length 875.6
  Top Layer w5: U4.AF11@1425.2,980.31 1425.2,960.63 1440.94,944.88 1440.94,917.32 1440.94,905.51 1440.94,846.46 1429.13,834.65 1429.13,685.04 1417.32,673.23 1417.32,551.18 1657.48,311.02 v2(1657.48,279.53)
  Bottom Layer w7.87: v2(1657.48,279.53) HDR_B1.35@1657.48,338.58
IO15: HDR_B1.37 U4.AE12 | length 918.3
  Top Layer w5: U4.AE12@1464.57,1019.68 1444.88,1000 1444.88,956.69 1456.69,944.88 1456.69,917.32 1456.69,905.51 1456.69,838.58 1444.88,826.77 1444.88,685.04 1456.69,673.23 1456.69,543.31 1688.98,311.02 v2(1688.98,279.53)
  Bottom Layer w7.87: v2(1688.98,279.53) HDR_B1.37@1688.98,338.58
IO16: HDR_B1.39 U4.AF12 | length 875.6
  Top Layer w5: U4.AF12@1464.57,980.31 1464.57,952.76 1472.44,944.88 1472.44,917.32 1472.44,905.51 1472.44,712.6 1492.13,692.91 1492.13,685.04 1480.31,673.23 1480.31,551.18 1720.47,311.02 v2(1720.47,279.53)
  Bottom Layer w7.87: v2(1720.47,279.53) HDR_B1.39@1720.48,338.58
IO17: HDR_B1.41 U4.AF13 | length 865.8
  Top Layer w5: U4.AF13@1503.94,980.31 1503.94,917.32 1503.94,901.57 1503.94,877.95 1500,874.02 1500,716.54 1507.87,708.66 1507.87,685.04 1519.68,673.23 1519.68,543.31 1751.97,311.02 v2(1751.97,279.53)
  Bottom Layer w7.87: v2(1751.97,279.53) HDR_B1.41@1751.97,338.58
IO18: HDR_B1.43 U4.AE15 | length 951.3
  Top Layer w5: U4.AE15@1582.68,1019.68 1602.36,1000 1602.36,952.76 1590.55,940.94 1590.55,917.32 1590.55,905.51 1590.55,885.83 1606.3,870.08 1606.3,740.16 1586.61,720.47 1574.8,720.47 1555.12,700.79 1555.12,685.04 1543.31,673.23 1543.31,551.18 1783.47,311.02 v2(1783.47,279.53)
  Bottom Layer w7.87: v2(1783.47,279.53) HDR_B1.43@1783.47,338.58
IO19: HDR_B1.45 U4.AF16 | length 907.7
  Top Layer w5: U4.AF16@1618.11,976.38 U4.AF16@1622.05,980.31 1622.05,956.69 1606.3,940.94 1606.3,917.32 1606.3,905.51 1606.3,889.76 1622.05,874.02 1622.05,736.22 1594.49,708.66 1582.68,708.66 1570.87,696.85 1570.87,685.04 1582.68,673.23 1582.68,543.31 1814.96,311.02 v2(1814.96,279.53)
  Bottom Layer w7.87: v2(1814.96,279.53) HDR_B1.45@1814.96,338.58
IO20: HDR_B1.47 U4.AE16 | length 934.6
  Top Layer w5: U4.AE16@1622.05,1019.68 1641.73,1000 1641.73,956.69 1622.05,937.01 1622.05,917.32 1622.05,905.51 1622.05,897.64 1637.8,881.89 1637.8,728.35 1618.11,708.66 1618.11,685.04 1606.3,673.23 1606.3,551.18 1846.46,311.02 v2(1846.46,279.53)
  Bottom Layer w7.87: v2(1846.46,279.53) HDR_B1.47@1846.46,338.58
IO21: HDR_B1.49 U4.AF17 | length 878.9
  Top Layer w5: U4.AF17@1661.42,980.31 1661.42,960.63 1669.29,952.76 1669.29,917.32 1669.29,905.51 1669.29,897.64 1653.54,881.89 1653.54,724.41 1633.86,704.72 1633.86,685.04 1645.67,673.23 1645.67,543.31 1877.95,311.02 v2(1877.95,279.53)
  Bottom Layer w7.87: v2(1877.95,279.53) HDR_B1.49@1877.96,338.58
IO22: HDR_B1.51 U4.AE17 | length 924.8
  Top Layer w5: U4.AE17@1661.42,1019.68 1681.1,1000 1681.1,917.32 1681.1,905.51 1681.1,889.76 1665.35,874.02 1665.35,720.47 1681.1,704.72 1681.1,685.04 1669.29,673.23 1669.29,551.18 1909.45,311.02 v2(1909.45,279.53)
  Bottom Layer w7.87: v2(1909.45,279.53) HDR_B1.51@1909.45,338.58
IO23: HDR_B1.53 U4.AE18 | length 918.3
  Top Layer w5: U4.AE18@1700.79,1019.68 1720.47,1000 1720.47,917.32 1720.47,905.51 1720.47,724.41 1696.85,700.79 1696.85,685.04 1708.66,673.23 1708.66,543.31 1940.95,311.02 v2(1940.95,279.53)
  Bottom Layer w7.87: v2(1940.95,279.53) HDR_B1.53@1940.95,338.58
IO24: HDR_B1.55 U4.AF19 | length 862.6
  Top Layer w5: U4.AF19@1740.16,980.31 1740.16,917.32 1740.16,905.51 1740.16,681.1 1732.28,673.23 1732.28,551.18 1972.44,311.02 v2(1972.44,279.53)
  Bottom Layer w7.87: v2(1972.44,279.53) HDR_B1.55@1972.44,338.58
IO25: HDR_B1.57 U4.AE19 | length 908.5
  Top Layer w5: U4.AE19@1740.16,1019.68 1759.84,1000 1759.84,917.32 1759.84,905.51 1759.84,775.59 1759.84,685.04 1771.65,673.23 1771.65,543.31 2003.94,311.02 v2(2003.94,279.53)
  Bottom Layer w7.87: v2(2003.94,279.53) HDR_B1.57@2003.94,338.58
IO26: HDR_B1.59 U4.AF20 | length 875.6
  Top Layer w5: U4.AF20@1779.53,980.31 1779.53,917.32 1779.53,905.51 1779.53,724.41 1807.09,696.85 1807.09,685.04 1795.27,673.23 1795.27,551.18 2035.43,311.02 v2(2035.43,279.53)
  Bottom Layer w7.87: v2(2035.43,279.53) HDR_B1.59@2035.44,338.58
IO27: HDR_B1.61 U4.AE20 | length 934.6
  Top Layer w5: U4.AE20@1779.53,1019.68 1799.21,1000 1799.21,964.57 1818.9,944.88 1818.9,917.32 1818.9,905.51 1799.21,885.83 1799.21,732.28 1818.9,712.6 1818.9,688.98 1834.64,673.23 1834.64,543.31 2066.93,311.02 v2(2066.93,279.53)
  Bottom Layer w7.87: v2(2066.93,279.53) HDR_B1.61@2066.93,338.58
IO28: HDR_B1.63 U4.AF21 | length 898.5
  Top Layer w5: U4.AF21@1818.9,980.31 1818.9,960.63 1830.71,948.82 1830.71,917.32 1830.71,905.51 1830.71,893.7 1814.96,877.95 1814.96,751.97 1870.08,696.85 1870.08,685.04 1858.27,673.23 1858.27,551.18 2098.43,311.02 v2(2098.43,279.53)
  Bottom Layer w7.87: v2(2098.43,279.53) HDR_B1.63@2098.43,338.58
IO29: HDR_B1.65 U4.AE21 | length 937.8
  Top Layer w5: U4.AE21@1818.9,1019.68 1838.58,1000 1838.58,996.06 1838.58,964.57 1838.58,960.63 1842.52,956.69 1842.52,917.32 1842.52,905.51 1842.52,881.89 1834.65,874.02 1830.71,870.08 1830.71,779.53 1850.39,759.84 1885.83,724.41 1885.83,685.04 1897.64,673.23 1897.64,543.31 2129.92,311.02 v2(2129.92,279.53)
  Bottom Layer w7.87: v2(2129.92,279.53) HDR_B1.65@2129.92,338.58
IO30: HDR_B1.67 U4.AF22 | length 898.5
  Top Layer w5: U4.AF22@1858.27,980.31 1858.27,964.57 1854.33,960.63 1854.33,917.32 1854.33,905.51 1854.33,881.89 1877.95,858.27 1877.95,751.97 1933.07,696.85 1933.07,685.04 1921.26,673.23 1921.26,551.18 2161.42,311.02 v2(2161.42,279.53)
  Bottom Layer w7.87: v2(2161.42,279.53) HDR_B1.67@2161.42,338.58
IO31: HDR_B1.69 U4.AE22 | length 937.8
  Top Layer w5: U4.AE22@1858.27,1019.68 1877.95,1000 1877.95,972.44 1925.2,925.2 1925.2,917.32 1925.2,905.51 1925.2,724.41 1948.82,700.79 1948.82,685.04 1960.63,673.23 1960.63,543.31 2192.91,311.02 v2(2192.91,279.53)
  Bottom Layer w7.87: v2(2192.91,279.53) HDR_B1.69@2192.92,338.58
IO32: HDR_B1.71 U4.AF23 | length 905
  Top Layer w5: U4.AF23@1897.64,980.31 1897.64,976.38 1937.01,937.01 1937.01,917.32 1937.01,905.51 1937.01,755.91 1996.06,696.85 1996.06,685.04 1984.25,673.23 1984.25,551.18 2224.41,311.02 v2(2224.41,279.53)
  Bottom Layer w7.87: v2(2224.41,279.53) HDR_B1.71@2224.41,338.58
IO33: HDR_B1.73 U4.AE23 | length 947.6
  Top Layer w5: U4.AE23@1897.64,1019.68 1917.32,1000 1917.32,972.44 1948.82,940.95 1948.82,917.32 1948.82,905.51 1948.82,763.78 2011.81,700.79 2011.81,685.04 2023.62,673.23 2023.62,543.31 2255.91,311.02 v2(2255.91,279.53)
  Bottom Layer w7.87: v2(2255.91,279.53) HDR_B1.73@2255.91,338.58
IO34: HDR_B1.75 U4.AF24 | length 914.8
  Top Layer w5: U4.AF24@1937.01,980.31 1937.01,976.38 1960.63,952.76 1960.63,917.32 1960.63,905.51 1960.63,795.28 2059.05,696.85 2059.05,685.04 2047.24,673.23 2047.24,551.18 2287.4,311.02 v2(2287.4,279.53)
  Bottom Layer w7.87: v2(2287.4,279.53) HDR_B1.75@2287.41,338.58
IO35: HDR_B1.77 U4.AE24 | length 957.4
  Top Layer w5: U4.AE24@1937.01,1019.68 1956.69,1000 1956.69,972.44 1972.44,956.69 1972.44,917.32 1972.44,905.51 1972.44,803.15 2074.8,700.79 2074.8,685.04 2086.61,673.23 2086.61,543.31 2318.9,311.02 v2(2318.9,279.53)
  Bottom Layer w7.87: v2(2318.9,279.53) HDR_B1.77@2318.9,338.58
KBCLOCK: HDR_T1.26 U4.A16 | length 843
  Top Layer w5: v2(1500,2665.35) 1500,2452.76 1645.67,2307.09 1645.67,2271.65 1637.8,2263.78 1637.8,2074.8 1606.3,2043.31 1606.3,2039.37 1606.3,2027.56 1606.3,1996.06 1622.05,1980.32 U4.A16@1622.05,1964.57
  Bottom Layer w7.87: HDR_T1.26@1500,2606.3 v2(1500,2665.35)
KBDATA: HDR_T1.28 U4.B16 | length 945.9
  Top Layer w5: v2(1531.5,2688.98) 1531.5,2515.75 1531.5,2440.94 1669.29,2303.15 1669.29,2271.65 1677.17,2263.78 1677.17,2240.16 1649.61,2212.6 1649.61,2070.87 1622.05,2043.31 1622.05,2039.37 1622.05,2027.56 1622.05,2000 1641.73,1980.32 1641.73,1944.88 U4.B16@1622.05,1925.2
  Bottom Layer w7.87: HDR_T1.28@1531.5,2606.3 v2(1531.5,2688.98)
LED0: HDR_B1.6 U4.AD6 | length 483.7
  Top Layer w7.87: v1(1208.66,1039.37) U4.AD6@1228.35,1059.05
  MidLayer1 w5: v2(1185.04,665.35) 1185.04,696.85 1192.91,704.72 1192.91,870.08 1177.17,885.83 1177.17,905.51 1177.17,917.32 1177.17,977.36 1208.66,1008.86 v1(1208.66,1039.37)
  Bottom Layer w7.87: HDR_B1.6@1185.04,606.3 v2(1185.04,665.35)
LED1: HDR_B1.8 U4.AC7 | length 532.9
  Top Layer w7.87: v1(1248.03,1078.74) U4.AC7@1267.72,1098.43
  MidLayer1 w5: v2(1216.54,688.98) 1216.54,866.14 1192.91,889.76 1192.91,905.51 1192.91,917.32 1192.91,933.07 1220.47,960.63 1220.47,1015.75 1228.35,1023.62 1228.35,1059.05 v1(1248.03,1078.74)
  Bottom Layer w7.87: HDR_B1.8@1216.54,606.3 v2(1216.54,688.98)
LED2: HDR_B1.10 U4.AC8 | length 630.8
  Top Layer w7.87: v1(1287.4,1078.74) U4.AC8@1307.09,1098.43
  MidLayer1 w5: v2(1248.03,665.35) 1248.03,877.95 1267.72,897.64 1267.72,905.51 1267.72,917.32 1267.72,1059.05 ; 1267.72,944.88 1267.72,1059.05 ; v1(1287.4,1078.74) 1267.72,1059.05
  Bottom Layer w7.87: HDR_B1.10@1248.03,606.3 v2(1248.03,665.35)
LED3: HDR_B1.12 U4.AD8 | length 464.2
  Top Layer w7.87: v1(1287.4,1039.37) U4.AD8@1307.09,1059.05
  MidLayer1 w5: v2(1279.53,688.98) 1279.53,889.76 1287.4,897.64 1287.4,905.51 1287.4,917.32 v1(1287.4,1039.37)
  Bottom Layer w7.87: HDR_B1.12@1279.53,606.3 v2(1279.53,688.98)
LED4: HDR_B1.14 U4.AC9 | length 519.8
  Top Layer w7.87: v1(1326.77,1078.74) U4.AC9@1346.46,1098.43
  MidLayer1 w5: v2(1311.02,665.35) 1311.02,736.22 1295.28,751.97 1295.28,885.83 1307.09,897.64 1307.09,905.51 1307.09,917.32 1307.09,1059.05 v1(1326.77,1078.74)
  Bottom Layer w7.87: HDR_B1.14@1311.03,606.3 v2(1311.02,665.35)
LED5: HDR_B1.16 U4.AD9 | length 467.4
  Top Layer w7.87: v1(1326.77,1039.37) U4.AD9@1346.46,1059.05
  MidLayer1 w5: v1(1326.77,1039.37) 1326.77,917.32 1326.77,905.51 1326.77,901.57 1342.52,885.83 v2(1342.52,688.98)
  Bottom Layer w7.87: HDR_B1.16@1342.52,606.3 v2(1342.52,688.98)
LED6: HDR_B1.18 U4.AD10 | length 464.2
  Top Layer w7.87: v1(1366.14,1039.37) U4.AD10@1385.83,1059.05
  MidLayer1 w5: v1(1366.14,1039.37) 1366.14,944.88 1366.14,917.32 1366.14,905.51 1366.14,696.85 1374.02,688.98 v2(1374.02,665.35)
  Bottom Layer w7.87: HDR_B1.18@1374.02,606.3 v2(1374.02,665.35)
LED7: HDR_B1.20 U4.AC10 | length 516.6
  Top Layer w7.87: v1(1366.14,1078.74) U4.AC10@1385.83,1098.43
  MidLayer1 w5: v1(1366.14,1078.74) 1385.82,1059.05 1385.82,917.32 1385.83,905.51 1385.83,755.91 1405.51,736.22 v2(1405.51,688.98)
  Bottom Layer w7.87: HDR_B1.20@1405.51,606.3 v2(1405.51,688.98)
LED_PGM: LED1.2 U2.4 | length 255.9
  Top Layer w7.87: LED1.2@1295.28,165.35 1301.18,165.35 1425.2,165.35 v1(1468.5,122.05)
  Bottom Layer w7.87: U2.4@1431.51,112.95 1435.5,111.55 U2.4@1440.94,109.65 ; U2.4@1433.07,125.98 1435.04,125.98 1438.97,122.05 v1(1468.5,122.05) ; U2.4@1440.94,104.33 U2.4@1440.94,109.65 ; U2.4@1440.94,122.05 1440.94,110.24 U2.4@1440.94,109.65
LED_PWR: LED2.1 R2.2 | length 102.8
  Top Layer w15.75: v1(1893.7,169.29) LED2.1@1935.04,169.29 LED2.1@1937.01,169.29
  Bottom Layer w15.75: v1(1893.7,169.29) R2.2@1953.23,169.29
LX: L1.1 U5.1 U5.3 U5.14 U5.16 | length 721.5
  Top Layer w15.75: U5.16@2592.58,1633.25 2660.81,1633.25 v3@2669.29,1641.73 ; U5.14@2592.58,1683.25 2651.4,1683.25 ; 2653.54,1681.1 2651.4,1683.25 ; v3@2669.29,1677.17 2663.21,1683.25 2651.4,1683.25 ; 2748.03,1641.73 2756.52,1633.25 U5.1@2824.58,1633.25 ; 2748.03,1677.17 2754.11,1683.25 U5.3@2824.58,1683.25
  Bottom Layer w78.74: 2381.89,1944.88 2653.54,1673.23 v3@2669.29,1673.23
  other v3: 2661.42,1641.73 2690.96,1641.73 2720.5,1641.73 2661.42,1669.29 2690.96,1669.29 2720.5,1669.29 2661.42,1696.85 2690.96,1696.85 2720.5,1696.85
M0: R14.2 U4.AE3 | length 281.1
  Top Layer w5: v1(995.9,905.5) 1028.89,938.49 1064.47,938.49 1090.55,964.57 1090.55,1000 U4.AE3@1110.24,1019.68
  Bottom Layer w5: R14.2@907.01,881.89 972.29,881.89 v1(995.9,905.5)
M1: R13.2 U4.AC3 | length 262.9
  Top Layer w7.87: v1(1090.55,1078.74) U4.AC3@1110.24,1098.43
  MidLayer1 w5: v1(940.94,968.5) 1000,1027.56 1039.37,1027.56 v1(1090.55,1078.74) ; v1@942.91,968.5 v1@942.91,970.47
  Bottom Layer w5: R13.2@907.01,968.5 v1(940.94,968.5) v1@940.94,964.57
M2: R11.2 U4.AF3 | length 268.1
  Top Layer w5: v1(1051.1,911.7) 1091.8,911.7 1104.17,924.07 1104.17,954.57 1110.24,960.63 U4.AF3@1110.24,980.31
  Bottom Layer w5: R11.2@907.01,926.69 R11.2@907.01,925.2 1012.1,925.2 1025.59,911.7 v1(1051.1,911.7)
MOUSECLOCK: HDR_T1.30 U4.A17 | length 839.7
  Top Layer w5: v2(1562.99,2665.35) 1562.99,2437.01 1708.66,2291.34 1708.66,2271.65 1696.85,2259.84 1696.85,2232.28 1661.42,2196.85 1661.42,2039.37 1661.42,2027.56 U4.A17@1661.42,1964.57
  Bottom Layer w7.87: HDR_T1.30@1562.99,2606.3 v2(1562.99,2665.35)
MOUSEDATA: HDR_T1.32 U4.B17 | length 957.3
  Top Layer w5: v2(1594.49,2688.98) 1594.49,2631.89 1576.77,2614.17 1576.77,2442.91 1732.28,2287.4 1732.28,2271.65 1744.09,2259.84 1744.09,2248.03 1692.91,2196.85 1692.91,2039.37 1692.91,2027.56 1692.91,2011.81 1681.1,2000 1681.1,1944.88 U4.B17@1661.42,1925.2
  Bottom Layer w7.87: HDR_T1.32@1594.49,2606.3 v2(1594.49,2688.98)
NetC127_1: C127.1 U6.6 | length 96.1
  Top Layer w5: U6.6@1940.94,2496.06 1972.44,2496.06 1996.06,2519.68 1996.06,2538.38 C127.1@1987.2,2547.24
NetLED1_1: LED1.1 R1.2 | length 87.1
  Top Layer w7.87: v1(1181.1,169.29) LED1.1@1222.44,169.29
  Bottom Layer w7.87: v1(1181.1,169.29) R1.2@1226.85,169.29
NetR21_2: R21.2 R22.1 | length 60
  Top Layer w13.78: R21.2@2910.94,1866.14 R22.1@2970.94,1866.14
NetRN1_8: RN1.8 RN4.5 | length 91.3
  Bottom Layer w5: RN1.8@1688.58,3271.65 RN4.5@1779.53,3271.65 RN4.5@1779.92,3271.65
NetRN2_8: RN2.8 RN6.5 | length 91.3
  Bottom Layer w5: RN2.8@1393.3,3271.65 RN6.5@1483.28,3271.66 RN6.5@1484.64,3271.65
NEXUS_TCK: HDR_T1.82 U4.P21 | length 1792
  Top Layer w7.87: U4.P21@1818.9,1452.76 v1(1838.58,1433.07)
  MidLayer3 w5: v1(1838.58,1433.07) 1858.27,1413.39 2078.74,1413.39 2090.55,1413.39 2106.3,1429.13 2106.3,1472.44 2129.92,1496.06 2181.1,1496.06 2287.4,1602.36 2287.4,2027.56 2433.07,2173.23 2433.07,2263.78 2425.2,2271.65 2425.2,2381.89 2381.89,2425.2 v2(2381.89,2665.35)
  Bottom Layer w7.87: HDR_T1.82@2381.89,2606.3 v2(2381.89,2665.35)
NEXUS_TDI: HDR_T1.84 U4.R21 | length 1873.3
  Top Layer w7.87: U4.R21@1818.9,1413.39 v1(1838.58,1393.7)
  MidLayer3 w5: v1(1838.58,1393.7) 1858.27,1374.02 2007.87,1374.02 2031.5,1397.64 2078.74,1397.64 2090.55,1397.64 2133.86,1397.64 2194.88,1458.66 2194.88,1494.09 2299.21,1598.43 2299.21,2023.62 2444.88,2169.29 2444.88,2251.97 2464.57,2271.65 2464.57,2377.95 2413.38,2429.13 v2(2413.38,2688.98)
  Bottom Layer w7.87: HDR_T1.84@2413.39,2606.3 v2(2413.38,2688.98)
NEXUS_TDO: HDR_T1.76 U4.B23 | length 1007.9
  Top Layer w5: U4.B23@1897.64,1925.2 1917.32,1944.88 1917.32,1984.25 1944.88,2011.81 1944.88,2027.56 1944.88,2039.37 1944.88,2110.24 2074.8,2240.15 2074.8,2259.84 2086.61,2271.65 2287.4,2472.44 2287.4,2661.42 v2(2287.4,2688.98)
  Bottom Layer w7.87: HDR_T1.76@2287.4,2606.3 v2(2287.4,2688.98)
NEXUS_TMS: HDR_T1.80 U4.P19 | length 1867.8
  Top Layer w7.87: U4.P19@1740.16,1452.76 v1@1759.84,1433.07
  MidLayer3 w5: v1(1759.84,1430.12) 1779.53,1452.76 2078.74,1452.76 2090.55,1452.76 2094.49,1456.69 2094.49,1476.38 2125.98,1507.87 2177.17,1507.87 2275.59,1606.3 2275.59,2031.5 2393.7,2149.61 2393.7,2263.78 2401.57,2271.65 2401.57,2366.14 2350.39,2417.33 v2(2350.39,2688.98)
  Bottom Layer w7.87: HDR_T1.80@2350.4,2606.3 v2(2350.39,2688.98)
NFAULT: R24.2 U6.8 | length 239.6
  Top Layer w5: R24.2@1741.65,2637.79 1741.65,2593.35 1788.75,2546.25 U6.8@1917.32,2546.25
ONE_WIRE.PIO2: U1.6
ONE_WIRE_DB_PB: HDR_B1.79 U4.AA8 | length 1949.5
  Top Layer w7.87: v1(1287.4,1157.48) U4.AA8@1307.09,1177.17
  MidLayer3 w5: v1(1287.4,1157.48) 1267.72,1137.79 1267.72,913.38 1267.72,889.76 1251.97,874.02 1251.97,688.98 1267.72,673.23 1267.72,622.05 1562.99,326.77 2334.65,326.77 2350.39,311.02 v2(2350.39,248.03)
  Bottom Layer w7.87: v2(2350.39,248.03) HDR_B1.79@2350.4,338.58
ONE_WIRE_DBID: HDR_T1.92 U1.2 | length 314.2
  Bottom Layer w5: HDR_T1.92@2539.37,2606.3 2539.37,2678.98 2539.37,2805.12 2580.71,2846.46 U1.2@2637.59,2846.45
ONE_WIRE_PIO1: HDR_T1.91 U1.3 | length 1181.7
  MidLayer2 w5: v1(2539.36,2248.03) 2539.36,2220.63 2560,2200 v1(2615,2200)
  Bottom Layer w5: v1(2539.36,2248.03) HDR_T1.91@2539.36,2318.89 ; v1(2615,2200) 2755.12,2200 2787.4,2232.28 2787.4,2562.4 2811.02,2586.02 2811.02,2716.53 2795.27,2732.28 2732.28,2732.28 2708.66,2755.9 2708.66,2877.95 2690.15,2896.45 U1.3@2637.59,2896.45
PROG_B: R15.2 U4.D3 | length 444.2
  Top Layer w7.87: v1(1090.55,1866.14) U4.D3@1110.24,1846.46
  MidLayer1 w5: v1(846.46,2062.99) 846.46,1962.96 901.78,1907.64 1001.81,1907.64 1043.31,1866.14 v1(1090.55,1866.14)
  Bottom Layer w5: R15.2@844.96,2094.48 846.46,2092.99 v1(846.46,2062.99)
REF_1V2: C124.2 U5.10 | length 86.8
  Top Layer w15.75: C124.2@2505.9,1783.46 2506.11,1783.25 U5.10@2592.58,1783.25
REF_CLK: HDR_B1.4 U4.AF14 | length 852.1
  Top Layer w5: v1(1523.62,736.22) 1547.24,759.84 1547.24,870.08 1543.31,874.02 1543.31,917.32 U4.AF14@1543.31,980.31
  MidLayer1 w5: v2(1153.54,688.98) 1153.54,665.35 1177.17,641.73 1511.81,641.73 1551.18,681.1 1551.18,708.66 v1(1523.62,736.22)
  Bottom Layer w7.87: HDR_B1.4@1153.55,606.3 v2(1153.54,688.98)
RS232_CTS: HDR_T1.22 U4.A15 | length 862.6
  Top Layer w5: v2(1437.01,2665.35) 1437.01,2472.44 1582.68,2326.77 1582.68,2271.65 1570.87,2259.84 1570.87,2251.97 1570.87,2248.03 1614.17,2204.72 1614.17,2094.49 1574.8,2055.12 1574.8,2039.37 1574.8,2027.56 1574.8,1988.19 1582.68,1980.32 U4.A15@1582.68,1964.57
  Bottom Layer w7.87: HDR_T1.22@1437.01,2606.3 v2(1437.01,2665.35)
RS232_RTS: HDR_T1.18 U4.A12 | length 843
  Top Layer w5: v2(1374.01,2665.35) 1374.01,2472.44 1519.68,2326.77 1519.68,2271.65 1507.87,2259.84 1507.87,2251.97 1500,2244.09 1500,2082.68 1472.44,2055.12 1472.44,2039.37 1472.44,2027.56 1472.44,1988.19 1464.57,1980.31 U4.A12@1464.57,1964.57
  Bottom Layer w7.87: HDR_T1.18@1374.02,2606.3 v2(1374.01,2665.35)
RS232_RX: HDR_T1.24 U4.B15 | length 939.4
  Top Layer w5: v2(1468.5,2688.98) 1468.5,2464.57 1606.3,2326.77 1606.3,2271.65 1625.98,2251.97 1625.98,2086.61 1590.55,2051.18 1590.55,2039.37 1590.55,2027.56 1590.55,1992.13 1602.36,1980.32 1602.36,1944.88 U4.B15@1582.68,1925.2
  Bottom Layer w7.87: HDR_T1.24@1468.5,2606.3 v2(1468.5,2688.98)
RS232_TX: HDR_T1.20 U4.A14 | length 913.1
  Top Layer w5: v2(1405.51,2688.98) 1405.51,2464.57 1543.31,2326.77 1543.31,2271.65 1555.12,2259.84 1555.12,2244.09 1602.36,2196.85 1602.36,2098.43 1543.31,2039.37 1543.31,2027.56 U4.A14@1543.31,1964.57
  Bottom Layer w7.87: HDR_T1.20@1405.51,2606.3 v2(1405.51,2688.98)
SCL: HDR_B1.5 U4.AA7 | length 1000.7
  Top Layer w7.87: v1(1248.03,1157.48) U4.AA7@1267.72,1177.17
  MidLayer3 w5: v2(1185.04,279.53) 1185.04,633.86 1204.72,653.54 1204.72,673.23 1192.91,685.04 1192.91,905.51 1192.91,917.32 1192.91,992.13 1228.35,1027.56 1228.34,1137.79 v1(1248.03,1157.48)
  Bottom Layer w7.87: v2(1185.04,279.53) HDR_B1.5@1185.04,338.58
SDA: HDR_B1.3 U4.AA6 | length 987.7
  Top Layer w7.87: v1(1208.66,1157.48) U4.AA6@1228.35,1177.17
  MidLayer3 w5: v2(1153.54,279.53) 1153.54,661.42 1177.17,685.04 1177.17,905.51 1177.17,917.32 1177.16,1015.75 1188.98,1027.56 1188.97,1137.79 v1(1208.66,1157.48)
  Bottom Layer w7.87: v2(1153.54,279.53) HDR_B1.3@1153.55,338.58
SLEEP_N: HDR_T1.93
SPI_CLK: HDR_T1.46 U4.E13 | length 1109.1
  Top Layer w7.87: v1(1484.25,1826.77) U4.E13@1503.94,1807.09
  MidLayer2 w5: v1(1484.25,1826.77) 1503.94,1846.46 1503.94,2027.56 1503.94,2039.37 1503.94,2043.31 1515.75,2055.12 1547.24,2055.12 1681.1,2188.98 1712.6,2188.98 1740.16,2216.54 1740.16,2263.78 1728.35,2275.59 1728.35,2295.28 1814.96,2381.89 v2(1814.96,2665.35)
  Bottom Layer w7.87: HDR_T1.46@1814.96,2606.3 v2(1814.96,2665.35)
SPI_DIN: HDR_T1.44 U4.H12 | length 1305
  Top Layer w7.87: v1(1444.88,1708.66) U4.H12@1464.57,1688.98
  MidLayer2 w5: v1(1444.88,1708.66) 1464.56,1728.35 1464.56,2027.56 1464.57,2039.37 1464.57,2051.18 1444.88,2070.87 1444.88,2169.29 1507.87,2232.28 1606.3,2232.28 1646.13,2272.11 1649.61,2275.59 1649.61,2318.9 1704.72,2374.02 1704.72,2610.24 v2(1783.46,2688.98)
  Bottom Layer w7.87: HDR_T1.44@1783.47,2606.3 v2(1783.46,2688.98)
SPI_DOUT: HDR_T1.50 U4.H15 | length 1199
  Top Layer w7.87: U4.H15@1582.68,1688.98 v1(1602.36,1708.66)
  MidLayer2 w5: v1(1602.36,1708.66) 1582.68,1728.35 1582.68,2027.56 1582.68,2039.37 1582.68,2051.18 1696.85,2165.35 1728.35,2165.35 1803.15,2240.16 1803.15,2263.78 1795.28,2271.65 1795.28,2291.34 1877.95,2374.01 v2(1877.95,2665.35)
  Bottom Layer w7.87: HDR_T1.50@1877.95,2606.3 v2(1877.95,2665.35)
SPI_MODE: HDR_T1.52 U4.E15 | length 1116.6
  Top Layer w7.87: U4.E15@1582.68,1807.09 v1(1602.36,1826.77)
  MidLayer2 w5: v1(1602.36,1826.77) 1622.05,1846.46 1622.05,2027.56 1622.05,2039.37 1622.05,2067.91 1707.68,2153.54 1736.22,2153.54 1822.83,2240.16 1822.83,2259.84 1909.45,2346.46 v2(1909.45,2688.98)
  Bottom Layer w7.87: HDR_T1.52@1909.45,2606.3 v2(1909.45,2688.98)
SPI_SEL: HDR_T1.48 U4.E14 | length 1168.5
  Top Layer w7.87: U4.E14@1543.31,1807.09 v1(1562.99,1826.77)
  MidLayer2 w5: v1(1562.99,1826.77) 1543.31,1846.46 1543.31,1874.02 1515.75,1901.57 1515.75,2027.56 1515.75,2039.37 1519.68,2043.31 1555.12,2043.31 1688.98,2177.17 1720.47,2177.17 1763.78,2220.47 1763.78,2263.78 1775.59,2275.59 1775.59,2287.4 1846.46,2358.27 v2(1846.46,2688.98)
  Bottom Layer w7.87: HDR_T1.48@1846.46,2606.3 v2(1846.46,2688.98)
SRAM1_A0: U4.AC18 U10.1 | length 1141.2
  Top Layer w7.87: U4.AC18@1700.79,1098.43 v1(1720.47,1078.74)
  MidLayer1 w5: v1(1720.47,1078.74) 1740.16,1059.05 1740.16,917.32 1740.16,905.51 1740.16,889.76 1748.03,881.89 1748.03,846.46 1866.14,728.35 v1(2523.62,728.35)
  Bottom Layer w5: U10.1@2478.44,728.34 v1(2523.62,728.35)
SRAM1_A1: U4.AC19 U10.2 | length 1254.9
  Top Layer w7.87: U4.AC19@1740.16,1098.43 v1(1759.84,1078.74)
  MidLayer1 w5: v1(1759.84,1078.74) 1779.53,1059.05 ; 1779.53,944.88 1779.53,1059.05 ; v1(2547.24,759.84) 1866.14,759.84 1779.53,846.46 1779.53,905.51 1779.53,917.32 1779.53,1059.05
  Bottom Layer w5: U10.2@2478.44,759.83 v1(2547.24,759.84)
SRAM1_A2: U4.AD21 U10.3 | length 955
  Top Layer w7.87: U4.AD21@1818.9,1059.05 v1(1838.58,1039.37)
  MidLayer1 w5: v1(1838.58,1039.37) 1838.58,1008.86 1830.71,1000.98 1830.71,955.71 1830.71,917.32 1830.71,905.51 1830.71,897.64 1937.01,791.34 v1(2523.62,791.34)
  Bottom Layer w5: U10.3@2478.44,791.33 v1(2523.62,791.34)
SRAM1_A3: U4.AD22 U10.4 | length 967.5
  Top Layer w7.87: U4.AD22@1858.27,1059.05 v1(1877.95,1039.37)
  MidLayer1 w5: v1(1877.95,1039.37) 1877.95,992.13 1854.33,968.5 1854.33,917.32 1854.33,905.51 1937.01,822.83 v1(2547.24,822.83)
  Bottom Layer w5: U10.4@2478.44,822.83 v1(2547.24,822.83)
SRAM1_A4: U4.AD23 U10.5 | length 825.2
  Top Layer w7.87: U4.AD23@1897.64,1059.05 v1(1917.32,1039.37)
  MidLayer1 w5: v1(1917.32,1039.37) 1972.44,984.25 1972.44,917.32 1972.44,905.51 1972.44,866.14 1984.25,854.33 v1(2523.62,854.33)
  Bottom Layer w5: U10.5@2478.44,854.32 v1(2523.62,854.33)
SRAM1_A5: U4.Y16 U10.18 | length 1580.2
  Top Layer w7.87: U4.Y16@1622.05,1216.54 v1(1641.73,1196.85)
  MidLayer4 w5: v1(1641.73,1196.85) 1661.42,1181.1 1661.42,1027.56 1661.42,948.82 1681.1,929.13 1681.1,917.32 1681.1,905.51 1795.28,791.34 1874.02,791.34 1914.37,831.69 2193.9,831.69 2299.21,937.01 2299.21,1122.05 2440.93,1263.77 v1(2523.83,1263.77)
  Bottom Layer w5: U10.18@2478.44,1263.77 v1@2527.77,1263.77